# Altium PCB Deserializer_V10.PcbDoc
Units mm, origin at the board's own origin, x right, y up, seen from the top; angles counter-clockwise.
Board outline 41.9 x 33.7 mm, 4 copper layers (L1 TOP, L2 GND, L3 GND, L4 BOTTOM), stack 1.581 mm thick; 69 components, 34 nets, 202 pads, 214 vias.
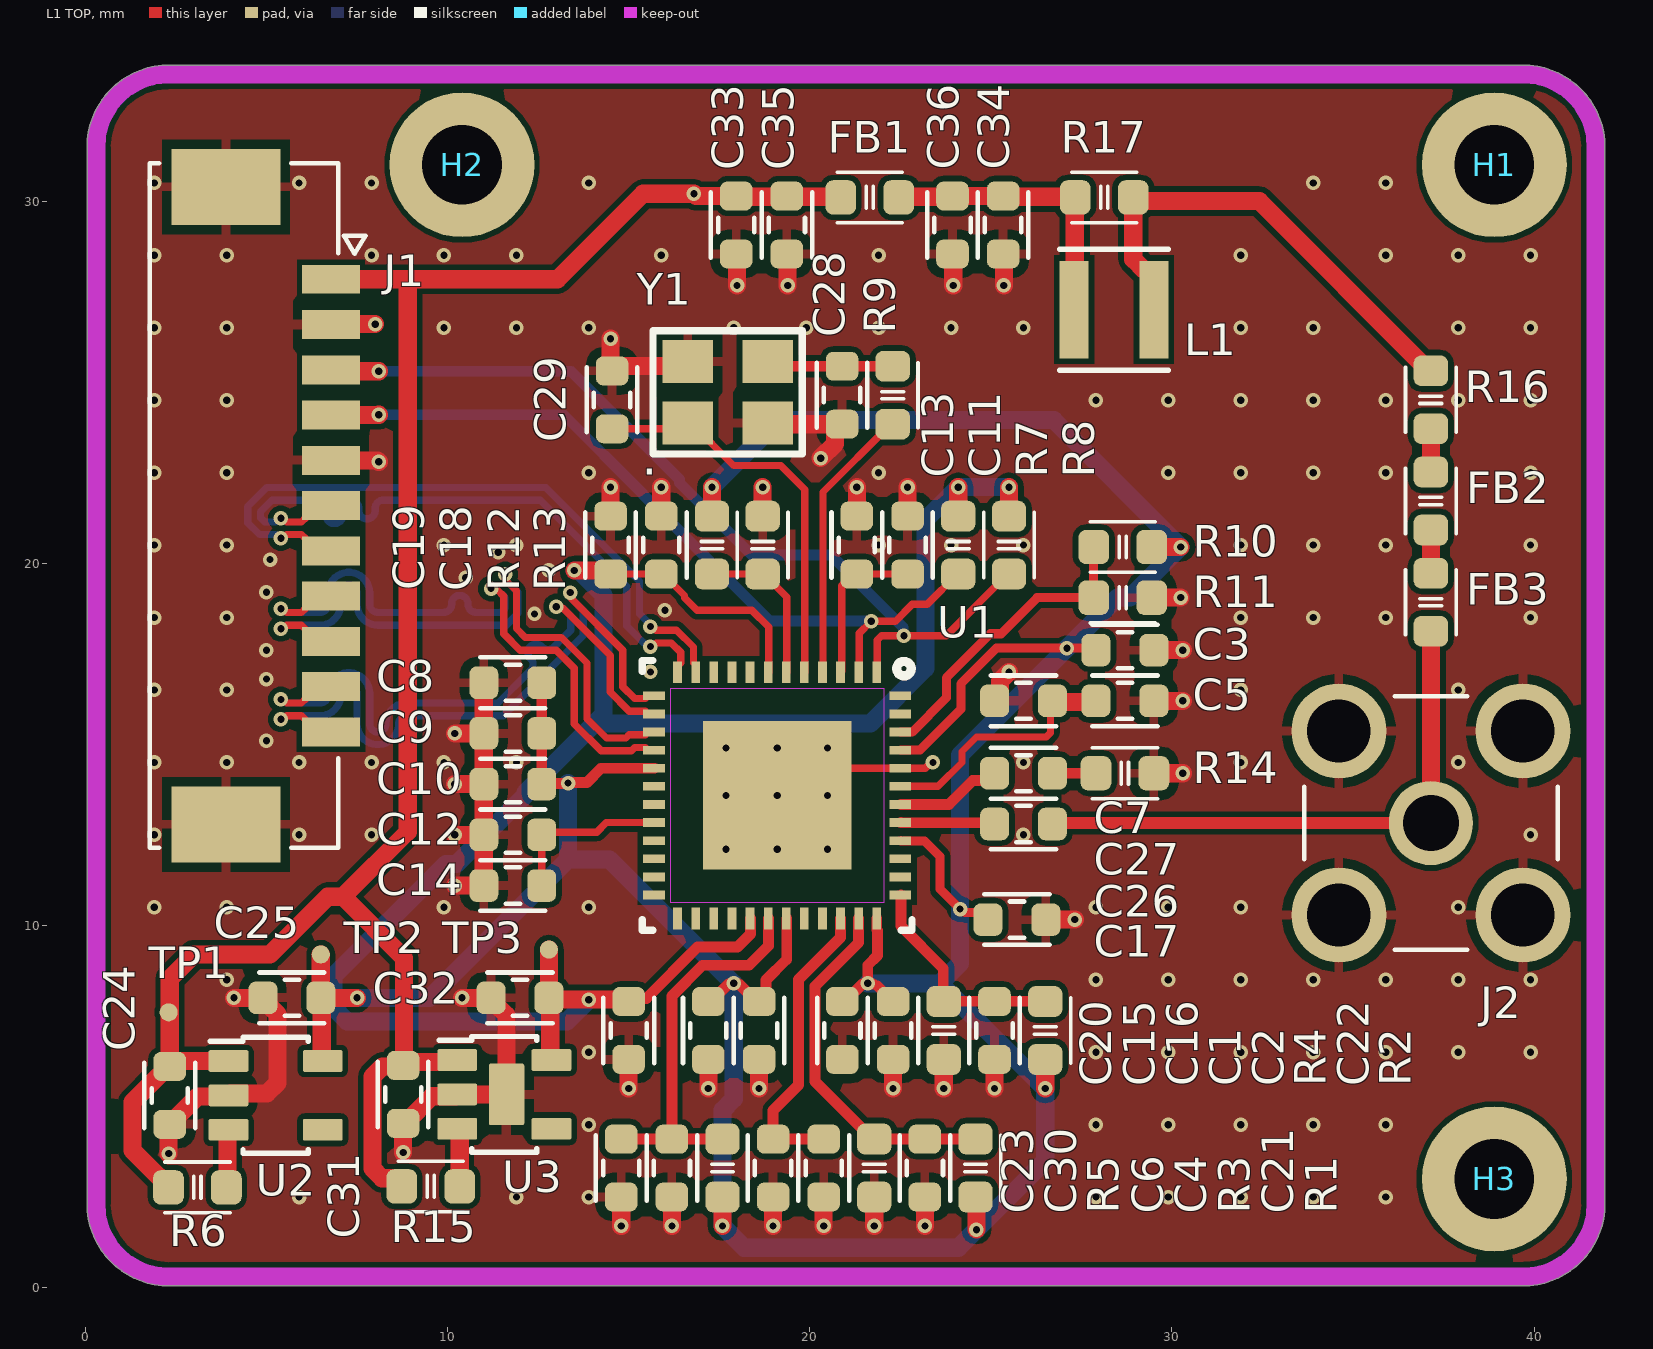
[diagram p0: L1 TOP view]
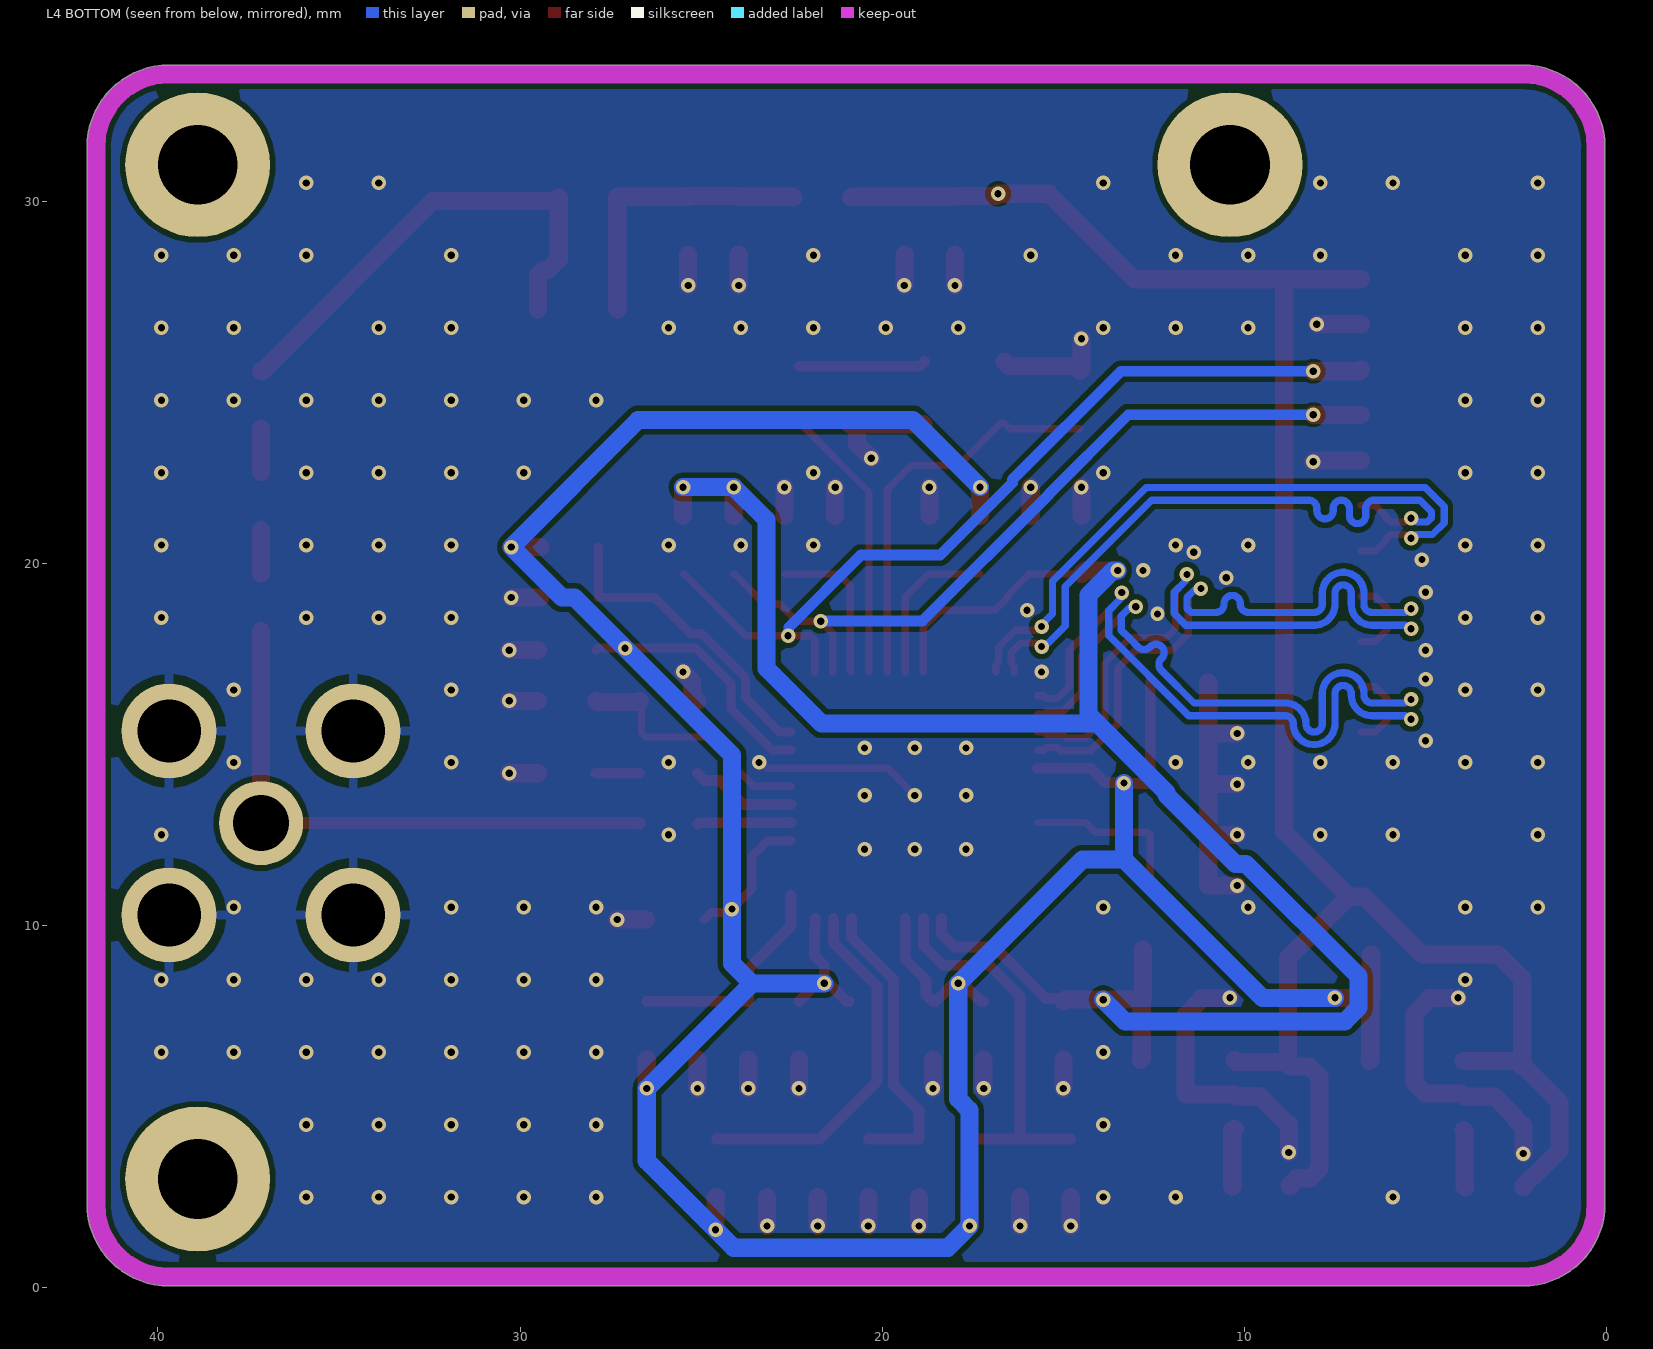
[diagram p1: L4 BOTTOM view, seen from below]
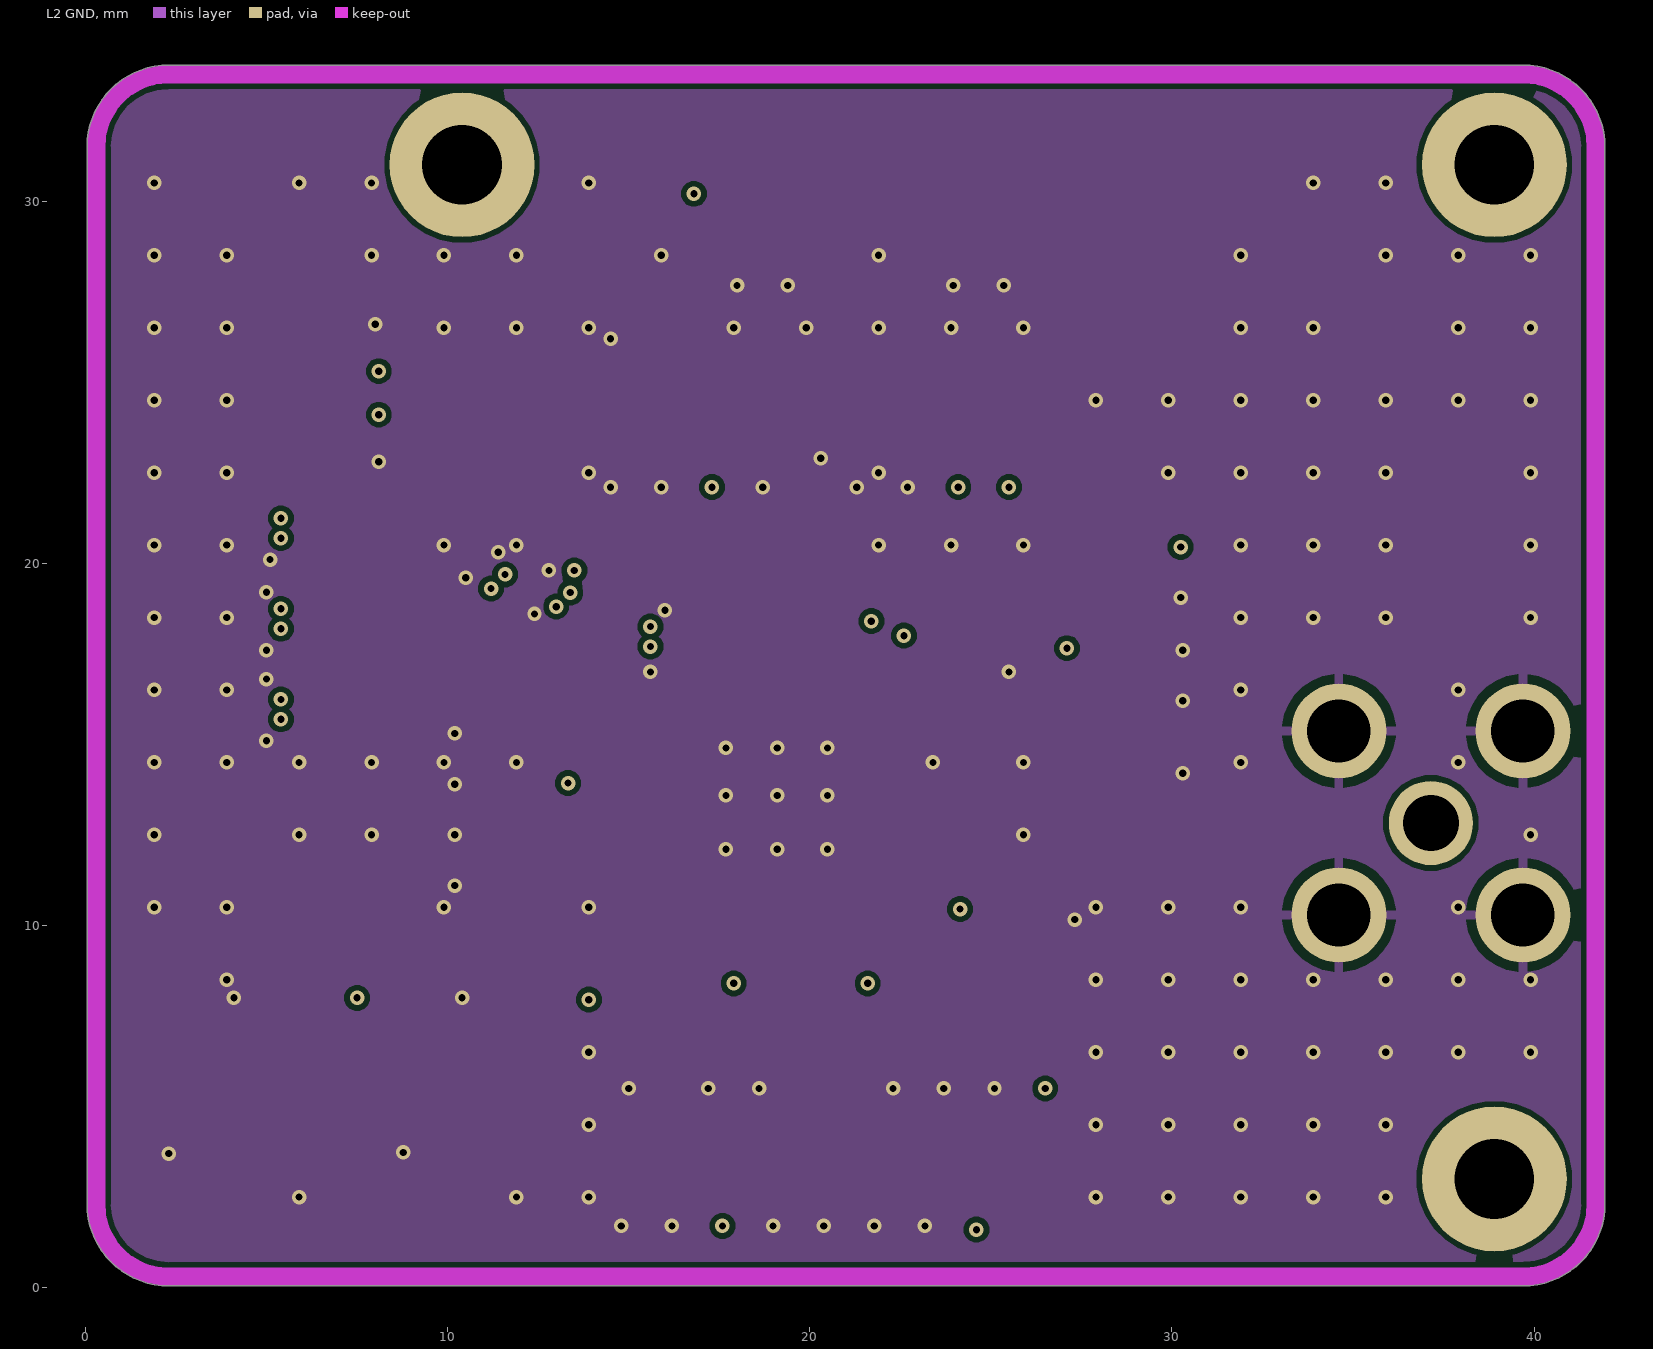
[diagram p2: L2 GND]
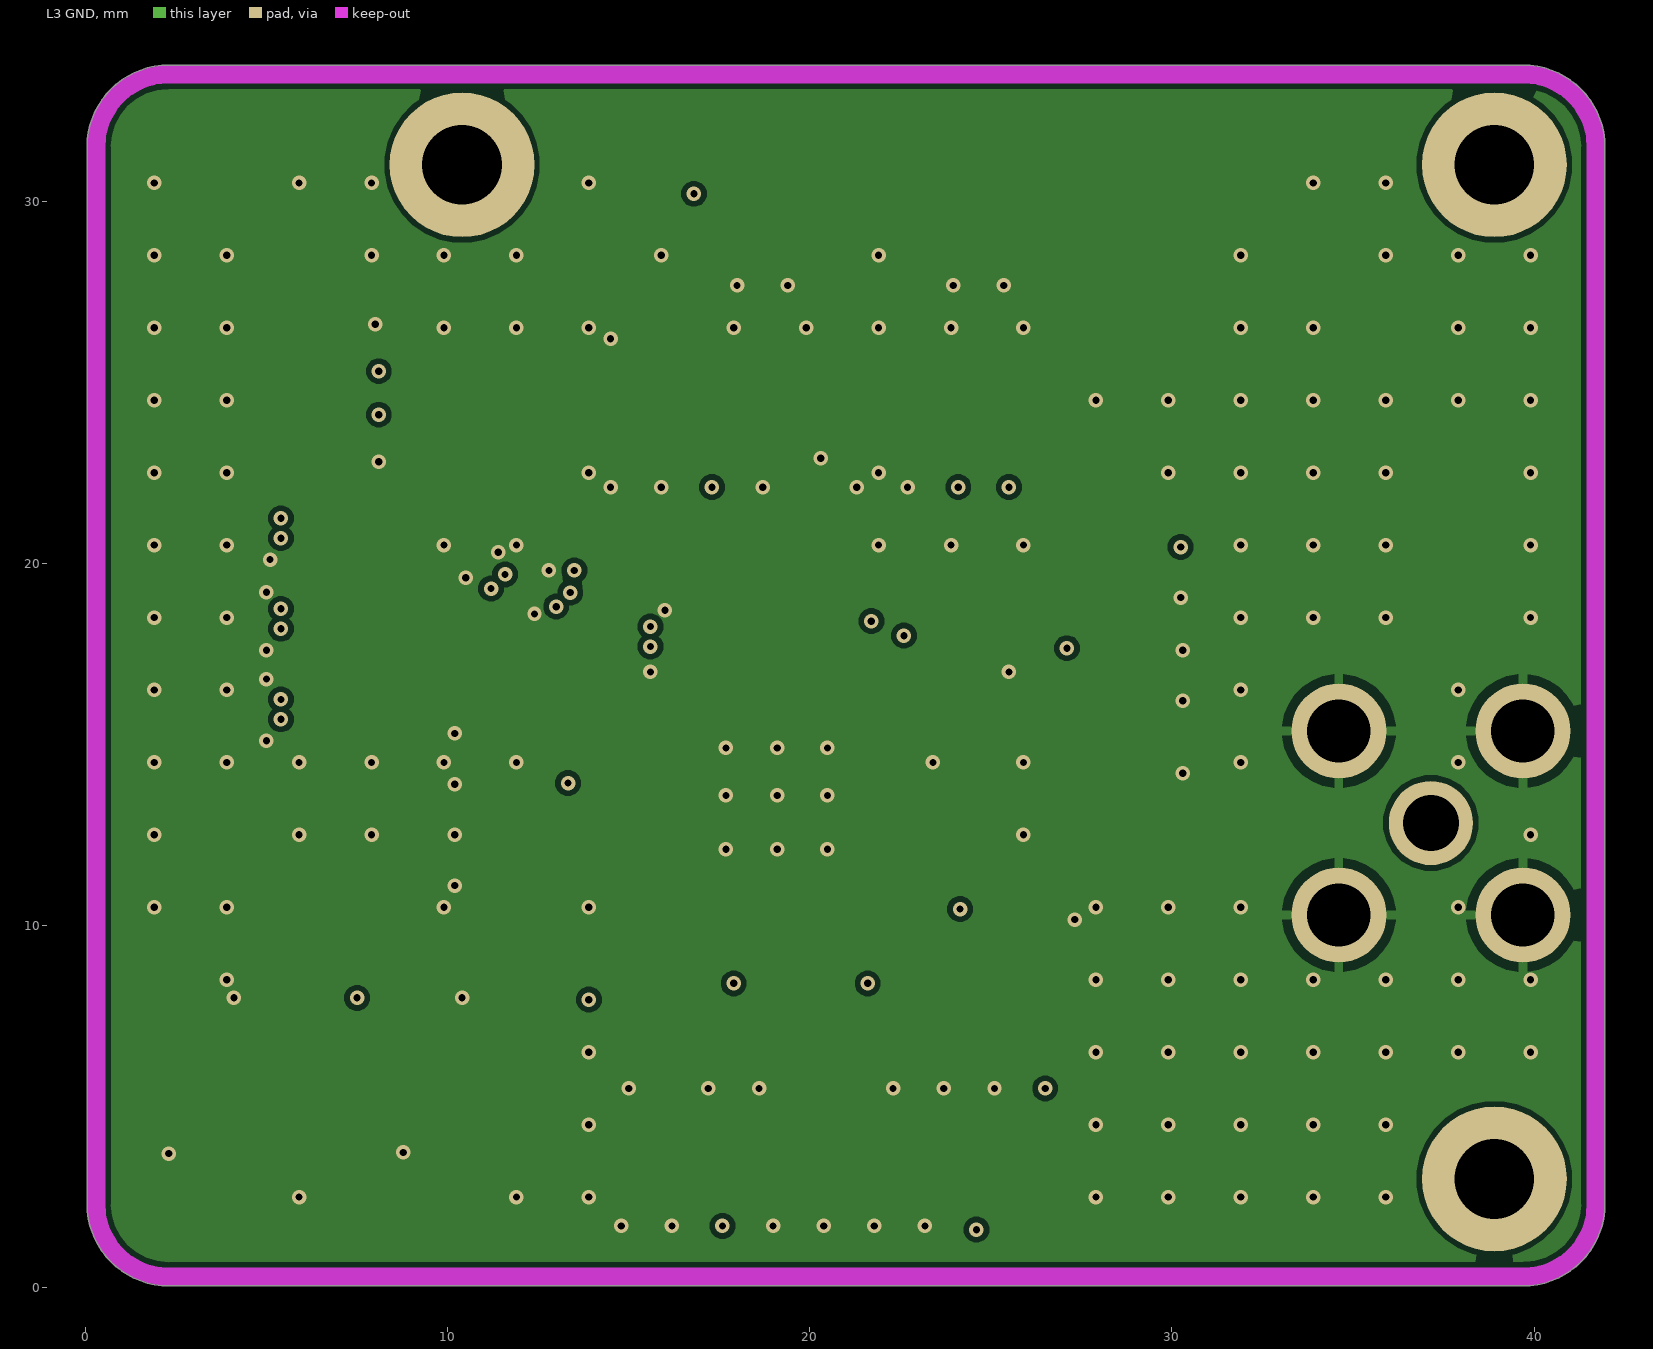
[diagram p3: L3 GND]
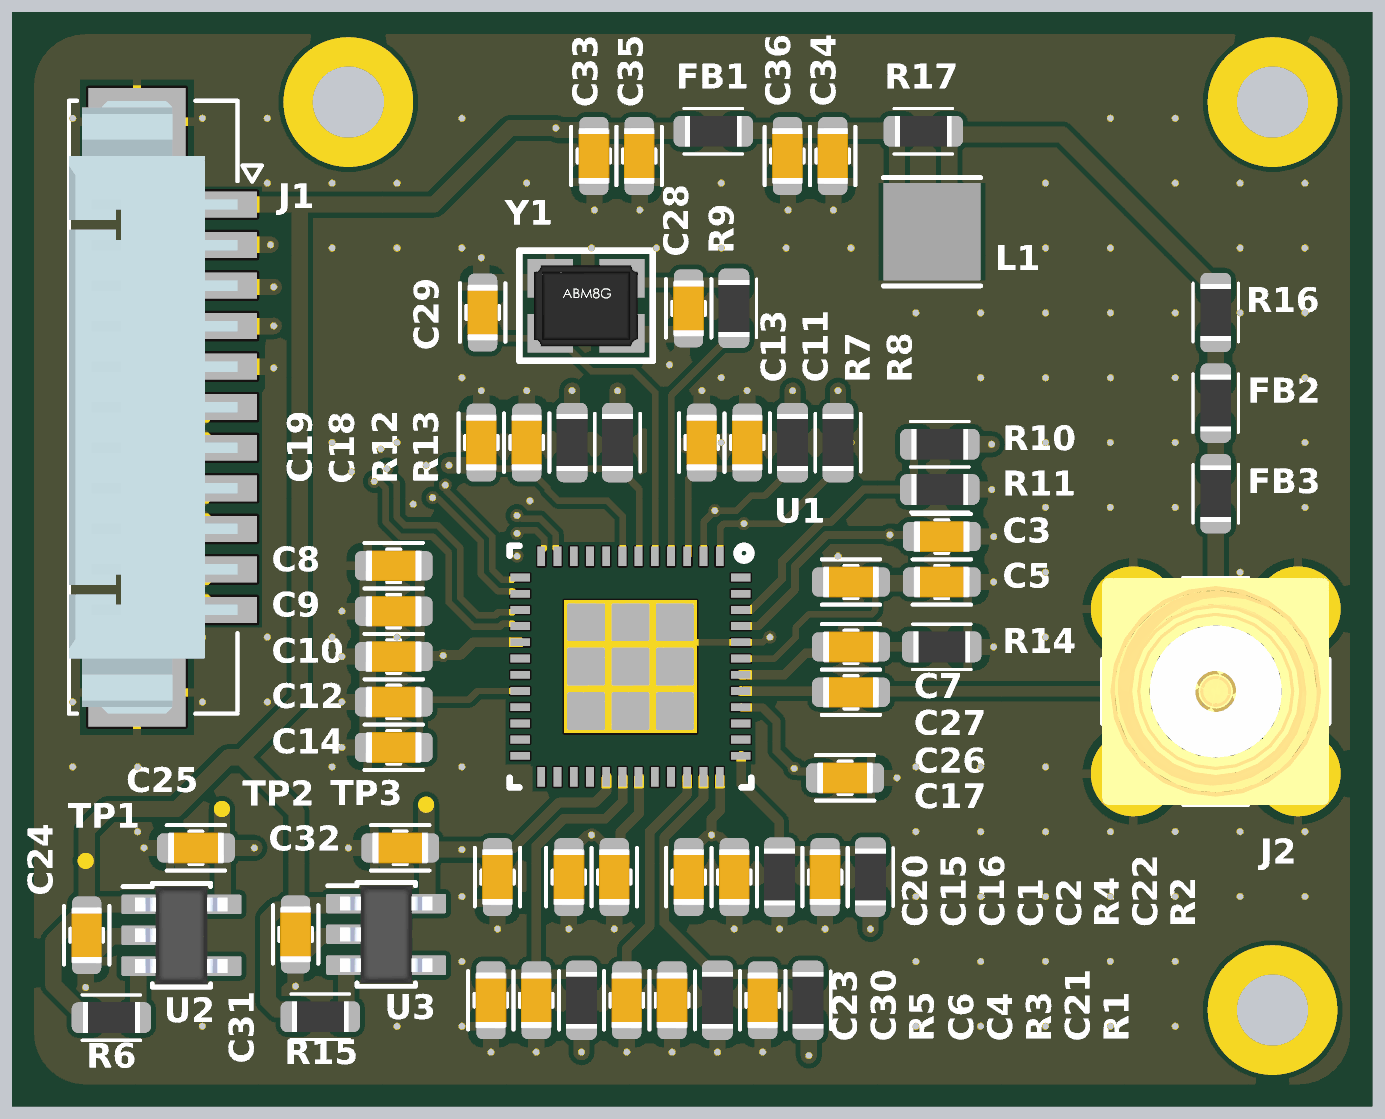
[diagram p4: 3D render of the assembled board from above, using the file's embedded part models]

## Layer stack, top to bottom
Top Solder: solder mask 0.0102, Solder Resist, Dk 3.5
L1 TOP: signal copper 0.035
Dielectric 2: prepreg 0.2, PP-006, Dk 4.5
L2 GND: signal copper 0.0356
Dielectric 1: dielectric 1.04, FR-4, Dk 4.8
L3 GND: signal copper 0.0356
Dielectric 3: prepreg 0.2, PP-006, Dk 4.5
L4 BOTTOM: signal copper 0.035
Bottom Solder: solder mask 0.0102, Solder Resist, Dk 3.5

## Board outline
0.05,2.3 0.05,31.503 cw(c2.3,31.5) 2.3,33.75 39.7,33.75 cw(c39.7,31.5) 41.95,31.5 41.95,2.3 cw(c39.7,2.3) 39.7,0.05 2.3,0.05 cw(c2.3,2.3)

## Design rules (kind name [scope] priority, off if disabled: settings)
Clearance [All] p1: gap=0.15 ignorepadtopadclearanceinfootprint=FALSE
DiffPairsRouting [InDifferentialPairClass('DIFF100')] p1: maxlimit=0.15 minlimit=0.127 mostfreqgap=0.15 toplayer_mingap=0.15 toplayer_minwidth=0.2 toplayer_maxwidth=0.2 toplayer_prefwidth=0.2 midlayer1_maxgap=0.127 midlayer1_prefgap=0.127 midlayer1_minwidth=0.069 midlayer1_maxwidth=0.069 midlayer1_prefwidth=0.069 midlayer2_maxgap=0.127 midlayer2_prefgap=0.127 midlayer2_minwidth=0.069 midlayer2_maxwidth=0.069 midlayer2_prefwidth=0.069 bottomlayer_mingap=0.15 bottomlayer_minwidth=0.2 bottomlayer_maxwidth=0.2 bottomlayer_prefwidth=0.2 impedanceprofiledriven=TRUE impedanceprofileid={50D43195-B933-46E9-9240-D5212A9A5187} maxuncoupledlength=12.7
MatchedLengths MatchedLengths_1 [InNetClass('MIPI1')] p1: tolerance=0.15 checknetsindiffpair=FALSE checkdiffpairvsdiffpair=TRUE checkxsignals=TRUE checkothers=TRUE
MatchedLengths [InDifferentialPairClass('DIFF100')] p2: tolerance=0.05 checknetsindiffpair=TRUE checkdiffpairvsdiffpair=FALSE checkxsignals=FALSE checkothers=FALSE
MinimumSolderMaskSliver [All] p1: minsoldermaskwidth=0.12
PolygonConnect PolygonConnect_GND [InNet('GND')] p1: thpad.connectstyle=Relief thpad.reliefconductorwidth=0.254 thpad.reliefentries=4 thpad.polygonreliefangle="90 Angle" thpad.airgapwidth=0.254 smdpad.connectstyle=Relief smdpad.reliefconductorwidth=0.254 smdpad.reliefentries=4 smdpad.polygonreliefangle="90 Angle" smdpad.airgapwidth=0.254 via.connectstyle=Direct via.reliefconductorwidth=0.254 via.reliefentries=4 via.polygonreliefangle="90 Angle" via.airgapwidth=0.254
PolygonConnect [All] p2: connectstyle=Relief reliefconductorwidth=0.254 reliefentries=4 polygonreliefangle="90 Angle" airgapwidth=0.254
RoutingVias [All] p1: holewidth=0.2 width=0.4 viastyle="Through Hole" minholewidth=0.2 minwidth=0.4 maxholewidth=0.2 maxwidth=0.4
SilkToSilkClearance [All] p1: silktosilkclearance=0.15
SilkToSolderMaskClearance [IsPad] p1: minsilkscreentomaskgap=0.12 clearancetoexposedcopper=FALSE
SolderMaskExpansion [All] p1: expansion=0 istentingtop=FALSE
SupplyNets "Schematic Supply Nets_3" [InNet('+5V')] p1: voltage=0.000
SupplyNets "Schematic Supply Nets_2" [InNet('GND')] p2: voltage=0.000
SupplyNets "Schematic Supply Nets_1" [InNet('+3.3V')] p3: voltage=0.000
SupplyNets "Schematic Supply Nets" [InNet('+1.8V')] p4: voltage=0.000
Width [All] p1: maxlimit=0.5 minlimit=0.2 preferedwidth=0.3
26 further rules are at their usual default settings.

## Classes and differential pairs
differential pair class DIFF100: CAM_CK CAM_D0 CAM_D1
net class DIFF100: CAM_CK_N CAM_CK_P CAM_D0_N CAM_D0_P CAM_D1_N CAM_D1_P
net class MIPI1: CAM_CK_N CAM_CK_P CAM_D0_N CAM_D0_P CAM_D1_N CAM_D1_P
differential pair CAM_D1: +CAM_D1_P -CAM_D1_N
differential pair CAM_D0: +CAM_D0_P -CAM_D0_N
differential pair CAM_CK: +CAM_CK_P -CAM_CK_N

## Components (designator, comment, footprint, x,y, rotation, side; value= is the part's Value field where it differs from the comment)
C1 "10uF/10V" CAP_C_1608X80 20.9,7.1 r90 top
C2 "0.1uF/10V" CAP_C_1608X80 22.3,7.1 r90 top
C3 "0.1uF/10V" CAP_C_1608X80 28.7,17.6 r180 top
C4 "10uF/10V" CAP_C_1608X80 20.384,3.302 r90 top
C5 "10uF/10V" CAP_C_1608X80 28.7,16.2 r180 top
C6 "0.1uF/10V" CAP_C_1608X80 18.987,3.302 r90 top
C7 "0.1uF/10V" CAP_C_1608X80 25.9,16.2 r0 top
C8 "10uF/10V" CAP_C_1608X80 11.8,16.7 r0 top
C9 "0.1uF/10V" CAP_C_1608X80 11.8,15.3 r0 top
C10 "0.1uF/10V" CAP_C_1608X80 11.8,13.9 r0 top
C11 "10uF/10V" CAP_C_1608X80 22.7,20.5 r270 top
C12 "10uF/10V" CAP_C_1608X80 11.8,12.5 r0 top
C13 "0.1uF/10V" CAP_C_1608X80 21.3,20.5 r270 top
C14 "0.1uF/10V" CAP_C_1608X80 11.8,11.1 r0 top
C15 "10uF/10V" CAP_C_1608X80 17.2,7.1 r90 top
C16 "0.1uF/10V" CAP_C_1608X80 18.6,7.1 r90 top
C17 "0.1uF/10V" CAP_C_1608X80 25.718,10.16 r180 top
C18 "10uF/10V" CAP_C_1608X80 15.9,20.5 r270 top
C19 "0.1uF/10V" CAP_C_1608X80 14.5,20.5 r270 top
C20 "0.1uF/10V" CAP_C_1608X80 15,7.1 r90 top
C21 "0.1uF/10V" CAP_C_1608X80 23.178,3.302 r90 top
C22 "0.1uF/10V" CAP_C_1608X80 25.1,7.1 r90 top
C23 "10uF/10V" CAP_C_1608X80 14.796,3.302 r90 top
C24 "10uF/10V" CAP_C_1608X80 2.331,5.307 r90 top
C25 "10uF/10V" CAP_C_1608X80 5.7,8 r0 top
C26 "0.033uF/10V" CAP_C_1608X80 25.9,12.8 r180 top
C27 "0.015uF/10V" CAP_C_1608X80 25.9,14.2 r180 top
C28 "27pF/10V" CAP_C_1608X80 20.892,24.638 r270 top
C29 "27pF/10V" CAP_C_1608X80 14.542,24.511 r90 top
C30 "10uF/10V" CAP_C_1608X80 16.193,3.302 r90 top
C31 "10uF/10V" CAP_C_1608X80 8.773,5.334 r90 top
C32 "10uF/10V" CAP_C_1608X80 12,8 r0 top
C33 "10uF/10V" CAP_C_1608X80 17.971,29.337 r90 top
C34 "10uF/10V" CAP_C_1608X80 25.337,29.337 r90 top
C35 "0.1uF/10V" CAP_C_1608X80 19.368,29.337 r90 top
C36 "0.1uF/10V" CAP_C_1608X80 23.94,29.337 r90 top
FB1 "1k@100MHz" IND_C_1608X60 21.654,30.099 r0 top value="600 Ohms @ 100 MHz"
FB2 "330R@100MHz" IND_C_1608X60 37.148,21.717 r90 top value="600 Ohms @ 100 MHz"
FB3 "47R@100MHz" IND_C_1608X60 37.148,18.923 r90 top value="600 Ohms @ 100 MHz"
H1 "M2" HEX-2.2mm 38.9,31 r0 top
H2 "M2" HEX-2.2mm 10.4,31 r0 top
H3 "M2" HEX-2.2mm 38.9,3 r0 top
J1 "0532611171" MOLEX_0532611171 4.382,21.59 r270 top
J2 "RFPC-SMA28-F" GRADCONN_RFPC-SMA28-F 37.148,12.827 r0 top
L1 "10uH" IND300X300X150 28.4,27 r0 top
R1 "DNP/0R" RES_C_1608X60 24.575,3.302 r270 top
R2 "78.7k" RES_C_1608X60 26.5,7.1 r270 top
R3 "10k" RES_C_1608X60 21.781,3.302 r90 top
R4 "97.6k" RES_C_1608X60 23.7,7.1 r90 top
R5 "10k" RES_C_1608X60 17.59,3.302 r90 top
R6 "10k" RES_C_1608X60 3.093,2.767 r0 top
R7 "DNP/4.7k" RES_C_1608X60 24.1,20.5 r270 top
R8 "DNP/4.7k" RES_C_1608X60 25.5,20.5 r270 top
R9 "0R" RES_C_1608X60 22.289,24.638 r90 top
R10 "DNP/0R" RES_C_1608X60 28.639,20.447 r180 top
R11 "0R" RES_C_1608X60 28.639,19.05 r180 top
R12 "DNP/0R" RES_C_1608X60 17.3,20.5 r270 top
R13 "0R" RES_C_1608X60 18.7,20.5 r270 top
R14 "49.9R" RES_C_1608X60 28.7,14.2 r0 top
R15 "10k" RES_C_1608X60 9.535,2.794 r0 top
R16 "0R" RES_C_1608X60 37.148,24.511 r270 top
R17 "4.02k" RES_C_1608X60 28.131,30.099 r180 top
TP1 "" Testpoint_50 2.3,7.6 r90 top
TP2 "" Testpoint_50 6.5,9.2 r90 top
TP3 "" Testpoint_50 12.799,9.333 r90 top
U1 "DS90UB954TRGZRQ1" QFN50P700X700X100-48N-EP410x410 19.1,13.589 r270 top
U2 "TLV75518PDBVR" SOT25 5.252,5.307 r0 top
U3 "TLV75733PDYDR" SOT25-EPAD 11.567,5.334 r0 top
Y1 "Crystal 4 Pins" CRYSTAL_ABM8G 17.732,24.719 r0 top value=25MHz

## Footprints (in the part's own frame and the unit in brackets; to place one, negate y for a bottom-side part, rotate by r counter-clockwise, add the part's x,y. Pads: shape width x height; smd on the part's side, far side on the other; paste and mask are expansions set on the pad)
CAP_C_1608X80 [mm] "Chip Capacitor, 2-Leads, Body 1.60x0.80mm, IPC Medium Density"
  rrect50% 0.8x0.9 smd: 1(-0.8,0) 2(0.8,0)
  silkscreen extent -0.9,-0.7 0.9,0.7, body extent -0.87,-0.48 0.87,0.48, height 0.85
CRYSTAL_ABM8G [mil]
  rect 55x47 smd: 1(-43.5,-33.5) 2(43.5,-33.5) 3(43.5,33.5) 4(-43.5,33.5)
  silkscreen extent -81,-67 81,67, body extent -63,-49 63,49, height 40
GRADCONN_RFPC-SMA28-F [mm]
  round 2.325 hole 1.55: 1(0,0)
  round 2.625 hole 1.75: G1(-2.54,2.54) G2(2.54,2.54) G3(-2.54,-2.54) G4(2.54,-2.54)
  silkscreen extent -3.5,-3.5 3.5,3.5, body extent -3.5,-3.5 3.5,3.5, height 9.6
HEX-2.2mm [mm]
  round 4 hole 2.2: 1(0,0)
IND300X300X150 [mm]
  rect 0.8x2.7 smd: 1(-1.1,0) 2(1.1,0)
  silkscreen extent -1.5,-1.67 1.5,1.67, body extent -1.5,-1.5 1.5,1.5, height 1.5
IND_C_1608X60 [mm] "Chip Resistor, 2-Leads, Body 1.63x0.83mm, IPC High Density"
  rrect50% 0.85x0.95 smd: 1(-0.8,0) 2(0.8,0)
  silkscreen extent -0.9,-0.7 0.9,0.7, body extent -0.87,-0.48 0.87,0.48, height 0.6
MOLEX_0532611171 [mm]
  rect 0.8x1.6 smd mask+0.076: 1(-6.25,2.4) 2(-5,2.4) 3(-3.75,2.4) 4(-2.5,2.4) 5(-1.25,2.4) 6(0,2.4) 7(1.25,2.4) 8(2.5,2.4) 9(3.75,2.4) 10(5,2.4) 11(6.25,2.4)
  rect 2.1x3 smd mask+0.076: M1(-8.8,-0.5) M2(8.8,-0.5)
  silkscreen extent -9.45,-2.6 9.45,3.35, body extent -9.45,-2.6 9.45,2.6, height 3.4
QFN50P700X700X100-48N-EP410x410 [mm]
  rect 0.6x0.24 smd paste+0 mask+0.051: 1(-3.4,2.75) 2(-3.4,2.25) 3(-3.4,1.75) 4(-3.4,1.25) 5(-3.4,0.75) 6(-3.4,0.25) 7(-3.4,-0.25) 8(-3.4,-0.75) 9(-3.4,-1.25) 10(-3.4,-1.75) 11(-3.4,-2.25) 12(-3.4,-2.75) 25(3.4,-2.75) 26(3.4,-2.25) 27(3.4,-1.75) 28(3.4,-1.25) 29(3.4,-0.75) 30(3.4,-0.25) 31(3.4,0.25) 32(3.4,0.75) 33(3.4,1.25) 34(3.4,1.75) 35(3.4,2.25) 36(3.4,2.75)
  rect 0.24x0.6 smd paste+0 mask+0.051: 13(-2.75,-3.4) 14(-2.25,-3.4) 15(-1.75,-3.4) 16(-1.25,-3.4) 17(-0.75,-3.4) 18(-0.25,-3.4) 19(0.25,-3.4) 20(0.75,-3.4) 21(1.25,-3.4) 22(1.75,-3.4) 23(2.25,-3.4) 24(2.75,-3.4) 37(2.75,3.4) 38(2.25,3.4) 39(1.75,3.4) 40(1.25,3.4) 41(0.75,3.4) 42(0.25,3.4) 43(-0.25,3.4) 44(-0.75,3.4) 45(-1.25,3.4) 46(-1.75,3.4) 47(-2.25,3.4) 48(-2.75,3.4)
  rect 4.1x4.1 smd paste-2.037 mask+0.051: 49(0,0)
  silkscreen extent -3.72,-3.72 3.72,3.72
RES_C_1608X60 [mm] "Chip Resistor, 2-Leads, Body 1.63x0.83mm, IPC High Density"
  rrect50% 0.85x0.95 smd: 1(-0.8,0) 2(0.8,0)
  silkscreen extent -0.9,-0.7 0.9,0.7, body extent -0.87,-0.48 0.87,0.48, height 0.6
SOT25 [mm]
  rrect16% 1.1x0.6 smd paste+0 mask+0: 1(-1.3,0.95) 2(-1.3,0) 3(-1.3,-0.95) 4(1.3,-0.95) 5(1.3,0.95)
  silkscreen extent -1.8,-1.6 0.9,1.6, body extent -1.43,-1.5 1.43,1.5, height 1.4
SOT25-EPAD [mm]
  rrect16% 1.1x0.6 smd paste+0 mask+0: 1(-1.3,0.95) 2(-1.3,0) 3(-1.3,-0.95) 4(1.3,-0.95) 5(1.3,0.95)
  rrect10% 0.975x1.7 smd paste+0 mask+0: 7(0.062,0)
  silkscreen extent -1.8,-1.6 0.9,1.6, body extent -1.43,-1.5 1.43,1.5, height 1.4
Testpoint_50 [mm]
  round 0.5 smd paste-2539.97 mask+0: 1(0,0)

## Part data
C1 C4 C5 C8 C11 C12 C15 C18 C23 C24 C25 C30 C31 C32 C33 C34: library part _CAP_C_High_2, "CAP High Value"
C2 C3 C6 C7 C9 C10 C13 C14 C16 C17 C19 C20 C21 C22 C26 C27 C28 C29 C35 C36: library part _CAP_C_2, "CAP"
FB1 FB2 FB3: library part BLM18AG601SN1D, "FERRITE BEAD 600 OHM 0603 1LN", Current Rating (Max)=500mA, DC Resistance (DCR) (Max)=380mOhm, Device Package="0603 (1608 Metric)", Impedance @ Frequency="600 Ohms @ 100 MHz", Manufacturer="Murata Electronics", Operating Temperature="-55°C ~ 125°C", Supplier Part Number 1=490-1014-1-ND, ComponentLink1Description=Datasheet, ComponentLink1URL=https://www.murata.com/en-us/products/productdata/8796738650142/ENFA0003.pdf, ComponentLink2Description="DigiKey Link", ComponentLink2URL=https://www.digikey.com/en/products/detail/murata-electronics/BLM18AG601SN1D/584225, Height (Max)="0.037\" (0.95mm)", lastupdated="7/10/2022 9:43:27 AM", Lifecycle Status=Active, Minimum Order=1, Mounting Type="Surface Mount", Number of Lines=1, Package / Case="0603 (1608 Metric)", Packaging=TapeAndReel, Part Number=BLM18AG601SN1D, Part Status=Active, partid=848, Price=0.02, Series="EMIFIL®, BLM18", Size / Dimension="0.063\" L x 0.032\" W (1.60mm x 0.80mm)", Supplier 1=DigiKey
H1 H2 H3: library part HEX-M3
J1: library part "Header 11x1_2M"
J2: "SMA Connector Jack, Female Socket 50 Ohms Panel Mount, Through Hole Solder", Package=None, Check_prices=https://www.snapeda.com/parts/RFPC-SMA28-F/GradConn/view-part/?ref=eda, MF=GradConn, MP=RFPC-SMA28-F, SnapEDA_Link=https://www.snapeda.com/parts/RFPC-SMA28-F/GradConn/view-part/?ref=snap
L1: library part _IND
R1 R2 R3 R4 R5 R6 R7 R8 R9 R10 R11 R12 R13 R14 R15 R16 R17: library part _RES_B_2, "RES"
TP1 TP2 TP3: library part "Test Point", "Test Point", Solder=NF
U1: library part IC_Deserializer_DS90UB954TRGZRQ1, "Dual 2 MP FPD-Link III deserializer with CSI-2 outputs for 2MP/60fps cameras & radar 48-VQFN -40 to 105", Manufacturer_Name="Texas Instruments", Copyright="Copyright (C) 2026 Ultra Librarian. All rights reserved.", Datasheet=https://www.ti.com/lit/gpn/ds90ub954-q1, Manufacturer_Part_Number=DS90UB954TRGZRQ1, RefDes=RefDes, TYPE=TYPE
U2: library part IC_POWER_AP7347DQ
U3: library part IC_POWER_TLV75733PDYDR
Y1: library part OSC_24MHz, "Crystal", Manufacturer 1="Abracon Corporation", Manufacturer Part Number 1=ABM8G-25.000MHZ-18-D2Y-T, Package=ABM8G, Supplier Part Number 1=535-10273-1-ND, Category=Crystal/Oscillator, ComponentLink1Description="SVN Datasheet", ComponentLink1URL=https://chn-vm-apps.microchip.com/mchprepo/parts/Datasheets/ABM8G.pdf, ComponentLink2Description="Local Datasheet", ComponentLink2URL=C:\ALTIUM_WORK\00001_MCHP-CDB\Datasheets\ABM8G.pdf, ComponentLink3Description="Open Symbol", ComponentLink3URL="C:\ALTIUM_WORK\00001_MCHP-CDB\Library\LibraryRefs\Crystal 4 Pins.SchLib", ComponentLink4Description="Open Footprint", ComponentLink4URL=C:\ALTIUM_WORK\00001_MCHP-CDB\Library\Footprints\CRYSTAL_ABM8G.PcbLib, ComponentLink5Description="Open Footprint 2", ComponentLink6Description="Open Footprint 3", ComponentLink7Description="Open Footprint 4", Description_="CRYSTAL 24MHz 18pF SMD ABM8G", Dev Tools Status=Production, MCHP-ID=OSC1047, Owner="Mark Loper", Populated=DNP, Quantity Override=1, Revision=1, Status="MCL Design", Supplier 1=Digi-Key, Symbol="Crystal 4 Pins", TYPE=Crystal

## Via types
v1: diameter 0.4, hole 0.2, L1 TOP to L4 BOTTOM, tented both sides, 214 vias

## Nets (pads, with @x,y where several pads share a name; then routed paths per layer and width w, separated by ;. In a path a pad name is that pad's centre, name@x,y a point inside that pad or via, vN(x,y) a via of type N, cw(c..) or ccw(c..) an arc to the next point about the centre after c; other vN are vias at no path point)
+1.8V: C1.2 C2.2 C3.2 C8.2 C9.2 C10.2 C15.2 C16.2 C17.2 C25.2 R1.2 R2.2 R5.1 R10.1 R12.1 TP2.1 U1.17 U1.31 U1.36 U1.40 U1.45 U2.5 | length 103.8
  L1 TOP w0.25: U1.40@22.514,12.339 22.519,12.334 23.166,12.334 23.6,11.9 23.6,11 v1(24.15,10.45) 24.191,10.45 24.285,10.356 24.722,10.356 C17.2 ; U1.45@22.514,14.839 22.519,14.844 23.044,14.844 24.17,15.97 24.17,16.67 25.153,17.653 v1(27.1,17.653) 27.847,17.653 C3.2
  L1 TOP w0.3: C10.2 C9.2 C8.2 ; C10.2@12.6,13.923 12.608,13.915 v1@13.31,13.915 ; v1(13.325,13.93) v1@13.31,13.915 ; U1.17@15.714,14.339 14.239,14.339 13.849,13.949 13.344,13.949 v1@13.31,13.915 ; C15.2 17.277,7.9 17.758,8.381 17.881,8.381 v1(17.9,8.4) 17.919,8.381 18.042,8.381 18.523,7.9 C16.2 18.794,8.094 18.794,8.494 19.364,9.064 U1.31@19.364,10.189 ; C1.2 20.977,7.9 21.458,8.381 21.581,8.381 v1(21.6,8.4) ; v1@21.742,8.381 21.619,8.381 v1(21.6,8.4) ; U1.36 21.85,9.879 21.87,9.859 21.87,9.17 21.6,8.9 v1(21.6,8.4) ; 21.864,8.336 C2.2
  L1 TOP w0.5: TP2.1 C25.2 ; U2.5 6.526,6.283 6.526,7.974 C25.2 ; v1(7.5,8) C25.2 ; R12.1 v1(17.3,22.1) ; v1(17.59,1.702) R5.1 ; R1.2 24.6,2.477 v1(24.6,1.6) ; v1(26.5,5.5) R2.2 ; R10.1 v1(30.239,20.447)
  L4 BOTTOM w0.5: v1(7.5,8) 9.5,8 13.325,11.825 ; v1(13.325,13.93) 13.325,11.825 ; v1(17.3,22.1) 19.15,23.95 26.736,23.95 v1(30.239,20.447) 28.842,19.05 28.497,19.05 24.15,14.703 24.15,8.95 23.6,8.4 ; v1(21.6,8.4) 23.6,8.4 ; 13.325,11.825 14.475,11.825 v1(17.9,8.4) 17.9,5.206 17.59,4.896 v1(17.59,1.702) 18.19,1.102 24.102,1.102 26.5,3.5 v1(26.5,5.5) 23.6,8.4
+3.3V: C18.2 C19.2 C20.2 C32.2 R7.1 R8.1 TP3.1 U1.7 U1.29 U3.5 | length 58.5
  L1 TOP w0.2: C19.2 15.95,19.7 16.542,19.108 16.542,19.044 16.886,18.7 18.4,18.7 18.864,18.236 U1.7@18.864,16.989
  L1 TOP w0.3: C20.2 15.087,7.987 15.49,7.987 16.903,9.4 18,9.4 18.364,9.764 U1.29@18.364,10.189
  L1 TOP w0.5: TP3.1 TP3.1 C32.2 ; U3.5 12.833,6.318 12.833,7.966 C32.2 ; v1(13.5,19.8) 14.4,19.8 C19.2 ; C20.2 14.95,7.95 v1(13.9,7.95) 12.85,7.95 C32.2 ; R7.1 v1(24.1,22.1) ; R8.1 v1(25.5,22.1)
  L4 BOTTOM w0.5: v1(13.5,19.8) 13.626,19.8 14.3,19.126 14.3,15.824 14.051,15.575 ; v1(13.9,7.95) 13.3,7.35 7.231,7.35 6.85,7.731 6.85,8.599 9.951,11.7 10.249,11.7 12.15,13.601 12.15,13.674 14.051,15.575 ; v1(25.5,22.1) v1(24.1,22.1) 23.2,21.2 23.2,17.1 21.675,15.575 14.3,15.575 14.051,15.575
+5V: C24.2 C31.2 C33.2 C35.2 FB1.1 J1.1 R6.1 R15.1 TP1.1 U2.1 U3.1 | length 58.3
  L1 TOP w0.5: R6.1 2.293,2.817 2.06,3.05 2.031,3.05 1.3,3.781 1.3,5.126 2.331,6.157 2.331,8.531 3,9.2 5.1,9.2 6.693,10.793 7.107,10.793 ; C24.2 2.481,6.257 U2.1 ; J1.1 8.9,27.84 ; R15.1 8.735,2.844 8.56,3.019 8.193,3.019 7.923,3.289 7.923,5.823 8.2,6.1 8.739,6.1 8.873,6.234 10.217,6.234 U3.1 ; C31.2@8.8,6.161 8.8,9.1 7.107,10.793 ; FB1.1 20.835,30.118 17.99,30.118 C33.2 16.863,30.137 v1(16.8,30.2) 15.4,30.2 13.04,27.84 8.9,27.84 ; 7.107,10.793 8.9,12.586 8.9,27.84
CAM_CK_N: J1.7 U1.11 | length 18.8
  L1 TOP w0.2: v1(5.4,20.69) 5.454,20.69 5.554,20.79 5.965,20.79 6.082,20.673 6.082,20.64 6.382,20.34 J1.7 ; v1(15.6,18.25) 15.654,18.25 15.754,18.15 16.323,18.15 16.789,17.684 16.789,17.244 16.864,17.169 U1.11@16.864,16.989
  L4 BOTTOM w0.2: v1(5.4,20.69) 5.346,20.69 5.246,20.79 4.805,20.79 4.483,21.112 4.483,21.568 5.005,22.09 12.71,22.09 15.3,19.5 15.3,18.604 15.6,18.304 v1(15.6,18.25)
CAM_CK_P: J1.6 U1.12 | length 18.8
  L1 TOP w0.2: v1(5.4,21.24) 5.454,21.24 5.554,21.14 5.965,21.14 6.082,21.257 6.082,21.29 6.382,21.59 J1.6 ; v1(15.6,17.7) 15.654,17.7 15.754,17.8 16.178,17.8 16.439,17.539 16.439,17.244 16.364,17.169 U1.12@16.364,16.989
  L4 BOTTOM w0.2: v1(5.4,21.24) 5.346,21.24 5.246,21.14 4.95,21.14 4.833,21.257 4.833,21.423 5.15,21.74 5.875,21.74 6.425,21.74 cw(c6.425,21.515) 6.65,21.515 6.65,21.318 ccw(c6.875,21.318) 6.875,21.093 ccw(c6.875,21.318) 7.1,21.318 7.1,21.515 cw(c7.325,21.515) 7.325,21.74 cw(c7.325,21.515) 7.55,21.515 7.55,21.446 ccw(c7.775,21.446) 7.775,21.221 ccw(c7.775,21.446) 8,21.446 8,21.515 cw(c8.225,21.515) 8.225,21.74 8.811,21.74 12.565,21.74 14.95,19.355 14.95,18.264 15.414,17.8 15.446,17.8 15.546,17.7 v1(15.6,17.7)
CAM_D0_N: J1.11 U1.13 | length 18.8
  L1 TOP w0.2: v1(5.4,15.69) 5.454,15.69 5.554,15.79 5.965,15.79 6.082,15.673 6.082,15.64 6.382,15.34 J1.11 ; v1(13.389,19.189) 13.427,19.151 13.427,19.009 14.838,17.598 14.838,16.59 15.164,16.264 15.459,16.264 15.534,16.339 U1.13@15.714,16.339
  L4 BOTTOM w0.2: v1(5.4,15.69) 5.454,15.69 5.554,15.79 6.2,15.79 6.475,15.79 ccw(c6.475,16.365) 7.05,16.365 7.05,16.402 cw(c7.275,16.402) 7.5,16.402 7.5,15.565 ccw(c8.075,15.565) 8.65,15.565 cw(c8.875,15.565) 8.875,15.79 9.683,15.79 11.535,15.79 13.747,18.003 13.747,18.689 13.427,19.009 13.427,19.151 v1(13.389,19.189)
CAM_D0_P: J1.10 U1.14 | length 18.7
  L1 TOP w0.2: v1(5.4,16.24) 5.454,16.24 5.554,16.14 5.965,16.14 6.082,16.257 6.082,16.29 6.382,16.59 J1.10 ; v1(13,18.8) 13.038,18.762 13.18,18.762 14.488,17.453 14.488,16.445 15.019,15.914 15.459,15.914 15.534,15.839 U1.14@15.714,15.839
  L4 BOTTOM w0.2: v1(5.4,16.24) 5.454,16.24 5.554,16.14 6.2,16.14 6.475,16.14 ccw(c6.475,16.365) 6.7,16.365 6.7,16.402 cw(c7.275,16.402) 7.85,16.402 7.85,15.565 ccw(c8.075,15.565) 8.3,15.565 cw(c8.875,15.565) 8.875,16.14 9.683,16.14 11.39,16.14 12.225,16.975 12.296,17.046 ccw(c12.137,17.205) 12.296,17.364 12.281,17.378 cw(c12.44,17.538) 12.281,17.697 cw(c12.44,17.538) 12.599,17.697 12.614,17.682 ccw(c12.773,17.841) 12.932,17.682 13.175,17.925 13.397,18.147 13.397,18.544 13.18,18.762 13.038,18.762 v1(13,18.8)
CAM_D1_N: J1.9 U1.15 | length 18.8
  L1 TOP w0.2: v1(5.4,18.19) 5.454,18.19 5.554,18.29 5.965,18.29 6.082,18.173 6.082,18.14 6.382,17.84 J1.9 ; v1(11.589,19.689) 11.627,19.651 11.627,19.509 11.9,19.236 11.9,18.437 11.9,18.195 12.145,17.95 13.145,17.95 13.85,17.245 13.85,15.709 14.386,15.173 14.928,15.173 15.019,15.264 15.459,15.264 15.534,15.339 U1.15@15.714,15.339
  L4 BOTTOM w0.2: v1(5.4,18.19) 5.454,18.19 5.554,18.29 6.2,18.29 6.475,18.29 ccw(c6.475,18.865) 7.05,18.865 7.05,19.175 cw(c7.275,19.175) 7.5,19.175 7.5,18.865 ccw(c8.075,18.865) 8.075,18.29 8.964,18.29 11.617,18.29 11.939,18.612 11.939,19.197 11.627,19.509 11.627,19.651 v1(11.589,19.689)
CAM_D1_P: J1.8 U1.16 | length 18.7
  L1 TOP w0.2: v1(5.4,18.74) 5.454,18.74 5.554,18.64 5.965,18.64 6.082,18.757 6.082,18.79 6.382,19.09 J1.8 ; v1(11.2,19.3) 11.238,19.262 11.38,19.262 11.55,19.091 11.55,18.582 11.55,18.05 12,17.6 13,17.6 13.5,17.1 13.5,15.564 14.241,14.823 15.073,14.823 15.164,14.914 15.459,14.914 15.534,14.839 U1.16@15.714,14.839
  L4 BOTTOM w0.2: v1(5.4,18.74) 5.454,18.74 5.554,18.64 6.2,18.64 6.475,18.64 ccw(c6.475,18.865) 6.7,18.865 6.7,19.175 cw(c7.275,19.175) 7.85,19.175 7.85,18.865 ccw(c8.075,18.865) 8.075,18.64 8.964,18.64 9.789,18.64 9.889,18.64 ccw(c9.889,18.865) 10.114,18.865 10.114,18.886 cw(c10.339,18.886) 10.339,19.111 cw(c10.339,18.886) 10.564,18.886 10.564,18.865 ccw(c10.789,18.865) 10.789,18.64 11.131,18.64 11.472,18.64 11.589,18.757 11.589,19.053 11.38,19.262 11.238,19.262 v1(11.2,19.3)
CAM_I2C_SCL: J1.4 R7.2 U1.2 | length 21.7
  L1 TOP w0.2: U1.2@21.364,16.989 21.364,18.064 v1@21.674,18.374 ; v1(21.7,18.4) 22.364,18.4 22.829,18.865 23.245,18.865 24.08,19.7 R7.2
  L1 TOP w0.5: J1.4 8.09,24.09 v1(8.1,24.1)
  L4 BOTTOM w0.3: v1(8.1,24.1) 13.207,24.1 15.4,21.907 15.4,21.893 18.893,18.4 v1(21.7,18.4)
CAM_I2C_SDA: J1.3 R8.2 U1.1 | length 24.3
  L1 TOP w0.2: U1.1@21.864,16.989 21.864,17.883 21.981,18 v1(22.6,18) 23.767,18 25.467,19.7 R8.2
  L1 TOP w0.5: J1.3 6.822,25.3 v1(8.1,25.3)
  L4 BOTTOM w0.3: v1(8.1,25.3) 13.407,25.3 16.4,22.307 16.4,22.222 18.398,20.224 20.583,20.224 22.581,18.226 22.581,18.019 v1(22.6,18)
DOUT: C26.1 FB3.1 J2.1 | length 15.8
  L1 TOP w0.32: C26.1 26.7,12.827 J2.1
  L1 TOP w0.5: J2.1 FB3.1
GND: C1.1 C2.1 C3.1 C4.1 C5.1 C6.1 C7.1 C8.1 C9.1 C10.1 C11.1 C12.1 C13.1 C14.1 C15.1 C16.1 C17.1 C18.1 C19.1 C20.1 C21.1 C22.1 C23.1 C24.1 C25.1 C28.2 C29.2 C30.1 C31.1 C32.1 C33.1 C34.1 C35.1 C36.1 J1.2 J1.5 J1.M1 J1.M2 J2.G1 J2.G2 J2.G3 J2.G4 R3.1 R4.1 R11.1 R13.1 R14.2 U1.44 U1.49 U2.2 U3.2 U3.7 Y1.2 Y1.4 | length 59.5
  L1 TOP w0.2: v1(19.1,13.589) 19.85,14.339 23.185,14.339 23.346,14.5 v1(23.4,14.5)
  L1 TOP w0.5: v1(2.3,3.7) 2.3,4.476 C24.1 2.381,4.507 2.531,4.657 2.531,4.707 3.101,5.277 3.922,5.277 U2.2 ; U2.2@4.002,5.357 5.007,5.357 5.3,5.65 5.3,7.55 4.9,7.95 C25.1 v1(4.1,8) ; J1.5 8.06,22.84 v1(8.1,22.8) ; J1.2 6.792,26.6 v1(8,26.6) ; v1(8.773,3.734) C31.1 8.823,4.534 9.573,5.284 10.217,5.284 U3.2 U3.7 11.629,7.52 11.2,7.95 C32.1 v1(10.4,8) ; v1(10.2,11.1) C14.1 C8.1 ; v1(10.2,12.5) C12.1 ; v1(10.2,13.9) C10.1 ; v1(10.2,15.3) C9.1 ; C19.1 v1(14.5,22.1) ; v1(14.5,26.2) 14.5,25.353 C29.2 14.672,25.441 16.497,25.441 Y1.4 ; v1(14.796,1.702) C23.1 ; v1(15,5.5) C20.1 ; C18.1 v1(15.9,22.1) ; v1(16.193,1.702) C30.1 ; v1(17.2,5.5) C15.1 ; v1(17.992,27.669) C33.1@17.992,28.516 ; v1(18.6,5.5) C16.1 ; R13.1 v1(18.7,22.1) ; Y1.2@18.867,23.838 C28.2 20.842,23.838 20.692,23.688 20.692,23.292 v1(20.3,22.9) ; v1(18.987,1.702) C6.1 ; v1(19.389,27.669) C35.1@19.389,28.516 ; v1(20.384,1.702) C4.1 ; C13.1 v1(21.3,22.1) ; v1(21.781,1.702) R3.1 ; v1(22.3,5.5) C2.1 ; C11.1 v1(22.7,22.1) ; v1(23.178,1.702) C21.1 ; v1(23.7,5.5) R4.1 ; v1(23.961,27.669) C36.1@23.961,28.516 ; v1(25.1,5.5) C22.1 ; C7.1 25.25,16.35 25.25,16.75 v1(25.5,17) ; v1(25.358,27.669) C34.1@25.358,28.516 ; C17.1 v1(27.318,10.16) ; R11.1 v1(30.239,19.05) ; R14.2 v1(30.3,14.2) ; C5.1 v1(30.3,16.2) ; C3.1 v1(30.3,17.6)
  other v1: 5.9,2.5 11.9,2.5 13.9,2.5 27.9,2.5 29.9,2.5 31.9,2.5 33.9,2.5 35.9,2.5 13.9,4.5 27.9,4.5 29.9,4.5 31.9,4.5 33.9,4.5 35.9,4.5 13.9,6.5 27.9,6.5 29.9,6.5 31.9,6.5 33.9,6.5 35.9,6.5 37.9,6.5 39.9,6.5 3.9,8.5 27.9,8.5 29.9,8.5 31.9,8.5 33.9,8.5 35.9,8.5 37.9,8.5 39.9,8.5 1.9,10.5 3.9,10.5 9.9,10.5 13.9,10.5 27.9,10.5 29.9,10.5 31.9,10.5 37.9,10.5 17.686,12.1 19.1,12.1 20.486,12.1 1.9,12.5 5.9,12.5 7.9,12.5 25.9,12.5 39.9,12.5 17.686,13.589 20.486,13.589 1.9,14.5 3.9,14.5 5.9,14.5 7.9,14.5 9.9,14.5 11.9,14.5 25.9,14.5 31.9,14.5 37.9,14.5 17.686,14.9 19.1,14.9 20.486,14.9 5,15.1 1.9,16.5 3.9,16.5 31.9,16.5 37.9,16.5 5,16.8 15.6,17 5,17.6 1.9,18.5 3.9,18.5 31.9,18.5 33.9,18.5 35.9,18.5 39.9,18.5 12.4,18.6 16,18.7 5,19.2 10.5,19.6 12.8,19.8 5.1,20.1 11.4,20.3 1.9,20.5 3.9,20.5 9.9,20.5 11.9,20.5 21.9,20.5 23.9,20.5 25.9,20.5 31.9,20.5 33.9,20.5 35.9,20.5 39.9,20.5 1.9,22.5 3.9,22.5 13.9,22.5 21.9,22.5 29.9,22.5 31.9,22.5 33.9,22.5 35.9,22.5 39.9,22.5 1.9,24.5 3.9,24.5 27.9,24.5 29.9,24.5 31.9,24.5 33.9,24.5 35.9,24.5 37.9,24.5 39.9,24.5 1.9,26.5 3.9,26.5 9.9,26.5 11.9,26.5 13.9,26.5 17.9,26.5 19.9,26.5 21.9,26.5 23.9,26.5 25.9,26.5 31.9,26.5 33.9,26.5 37.9,26.5 39.9,26.5 1.9,28.5 3.9,28.5 7.9,28.5 9.9,28.5 11.9,28.5 15.9,28.5 21.9,28.5 31.9,28.5 35.9,28.5 37.9,28.5 39.9,28.5 1.9,30.5 5.9,30.5 7.9,30.5 13.9,30.5 33.9,30.5 35.9,30.5
NetC4_2: C4.2 C6.2 U1.34 | length 8.3
  L1 TOP w0.3: C4.2 19.028,4.102 C6.2 18.987,4.887 19.692,5.592 19.692,8.506 20.85,9.664 U1.34
NetC5_2: C5.2 C7.2 U1.43 | length 7.1
  L1 TOP w0.2: U1.43@22.514,13.839 23.539,13.839 24.2,14.5 24.2,14.8 24.6,15.2 26.528,15.2 26.645,15.317 26.645,16.145 C7.2
  L1 TOP w0.5: C7.2 26.7,16.165 27.865,16.165 C5.2
NetC11_2: C11.2 C13.2 U1.3 | length 4.4
  L1 TOP w0.2: U1.3@20.864,16.989 20.884,17.009 20.884,19.385 21.199,19.7 C11.2
NetC12_2: C12.2 C14.2 U1.20 | length 4.7
  L1 TOP w0.2: C14.2 C12.2 12.673,12.573 14.118,12.573 14.384,12.839 U1.20@15.714,12.839
NetC21_2: C21.2 R1.1 R3.2 U1.35 | length 10.1
  L1 TOP w0.3: U1.35 21.35,9.527 20.142,8.319 20.142,5.691 21.731,4.102 R3.2 C21.2 R1.1
NetC22_2: C22.2 R2.1 R4.2 U1.37 | length 6.2
  L1 TOP w0.3: U1.37@22.514,10.839 22.514,9.986 23.686,8.814 23.686,7.914 R4.2 23.706,7.906 C22.2@25.077,7.906 ; C22.2 25.106,7.906 26.474,7.906 26.494,7.906 R2.1
NetC23_2: C23.2 C30.2 R5.2 U1.30 | length 10.7
  L1 TOP w0.3: C23.2 C30.2 ; R5.2 C30.2 ; U1.30@18.864,10.189 18.864,9.439 18.325,8.9 17.04,8.9 16.193,8.053 C30.2
NetC27_1: C27.1 R14.1 | length 1.2
  L1 TOP w0.3: C27.1 R14.1
NetC28_1: C28.1 R9.2 Y1.3 | length 3.5
  L1 TOP w0.3: Y1.3 18.969,25.438 C28.1 R9.2
NetC29_1: C29.1 U1.5 Y1.1 | length 11.2
  L1 TOP w0.2: C29.1 16.47,23.711 Y1.1 16.729,23.868 17.897,22.7 19.2,22.7 19.864,22.036 U1.5@19.864,16.989
NetC34_2: C34.2 C36.2 FB1.2 L1.1 R17.2 | length 8
  L1 TOP w0.5: FB1.2 22.473,30.118 23.921,30.118 C36.2 C34.2 25.356,30.118 27.312,30.118 27.316,30.114 27.316,27.015 L1.1
NetFB2_1: FB2.1 FB3.2 | length 1.2
  L1 TOP w0.5: FB3.2 FB2.1
NetFB2_2: FB2.2 R16.2 | length 1.2
  L1 TOP w0.5: FB2.2 R16.2
NetL1_2: L1.2 R16.1 R17.1 | length 13.5
  L1 TOP w0.5: R17.1 28.931,28.393 29.224,28.1 29.35,28.1 29.5,27.95 L1.2 ; R17.1@29.004,30 32.409,30 37.098,25.311 R16.1
NetR6_2: R6.2 U2.3 | length 1.6
  L1 TOP w0.5: R6.2 3.922,2.796 3.922,4.327 U2.3
NetR9_1: R9.1 U1.4 | length 7.7
  L1 TOP w0.2: U1.4@20.364,16.989 20.364,21.963 22.239,23.838 R9.1
NetR10_2: R10.2 R11.2 U1.46 | length 8.6
  L1 TOP w0.25: U1.46@22.514,15.339 22.823,15.339 23.77,16.287 23.77,16.836 24.987,18.053 25.282,18.053 26.279,19.05 R11.2 R10.2
NetR12_2: R12.2 R13.2 U1.6 | length 4.3
  L1 TOP w0.2: R12.2 R13.2 ; R13.2@18.783,19.647 19.364,19.066 U1.6@19.364,16.989
NetR15_2: R15.2 U3.3 | length 1.6
  L1 TOP w0.5: U3.3 10.285,4.384 10.335,4.334 R15.2
RIN0_N: C27.2 U1.42 | length 2.9
  L1 TOP w0.3: U1.42@22.514,13.339 23.839,13.339 24.5,14 24.9,14 C27.2
RIN0_P: C26.2 U1.41 | length 2.6
  L1 TOP w0.3: U1.41@22.514,12.839 22.52,12.833 25.067,12.833 C26.2
pads on no net: H1.1 H2.1 H3.1 U1.8 U1.9 U1.10 U1.18 U1.19 U1.21 U1.22 U1.23 U1.24 U1.25 U1.26 U1.27 U1.28 U1.32 U1.33 U1.38 U1.39 U1.47 U1.48 U2.4 U3.4

## Polygon pours and split planes (outlines as drawn)
GND on L2 GND "GND_L02_P001" (solid, remove dead copper, pour order 1): 0.05,2.3 0.05,31.503 cw(c2.3,31.5) 2.3,33.75 39.7,33.75 cw(c39.7,31.5) 41.95,31.5 41.95,2.3 cw(c39.7,2.3) 39.7,0.05 2.3,0.05 cw(c2.3,2.3)
GND on L4 BOTTOM "GND_L04_P003" (solid, remove dead copper, pour order 3): 0.05,2.3 0.05,31.503 cw(c2.3,31.5) 2.3,33.75 39.7,33.75 cw(c39.7,31.5) 41.95,31.5 41.95,2.3 cw(c39.7,2.3) 39.7,0.05 2.3,0.05 cw(c2.3,2.3)
GND on L1 TOP "GND_L01_P000" (solid, remove dead copper, pour order 0): 0.05,2.3 0.05,31.503 cw(c2.3,31.5) 2.3,33.75 39.7,33.75 cw(c39.7,31.5) 41.95,31.5 41.95,2.3 cw(c39.7,2.3) 39.7,0.05 2.3,0.05 cw(c2.3,2.3)
GND on L3 GND "GND_L03_P002" (solid, remove dead copper, pour order 2): 0.05,2.3 0.05,31.503 cw(c2.3,31.5) 2.3,33.75 39.7,33.75 cw(c39.7,31.5) 41.95,31.5 41.95,2.3 cw(c39.7,2.3) 39.7,0.05 2.3,0.05 cw(c2.3,2.3)

## Keep-outs
L1 TOP:
  region: 16.15,16.539 16.15,10.639 22.05,10.639 22.05,16.539
Keep-Out Layer:
  lines w0.5: 0.3,31.5 cw(c2.3,31.5) 2.3,33.5 39.7,33.5 cw(c39.7,31.5) 41.7,31.5 41.7,2.3 cw(c39.7,2.3) 39.7,0.3 2.3,0.3 cw(c2.3,2.3) 0.3,2.3 ; 0.3,2.3 0.3,27.1 0.3,31.503 ; 0.3,2.3 0.3,2.3 ; 0.3,31.503 0.3,31.503